# Altium PCB PCB1.PcbDoc
Units mm, origin at the board's own origin, x right, y up, seen from the top; angles counter-clockwise.
Board outline 44.07 x 33.15 mm, 2 copper layers (Top Layer, Bottom Layer); 10 components, 9 nets, 41 pads, 4 vias.
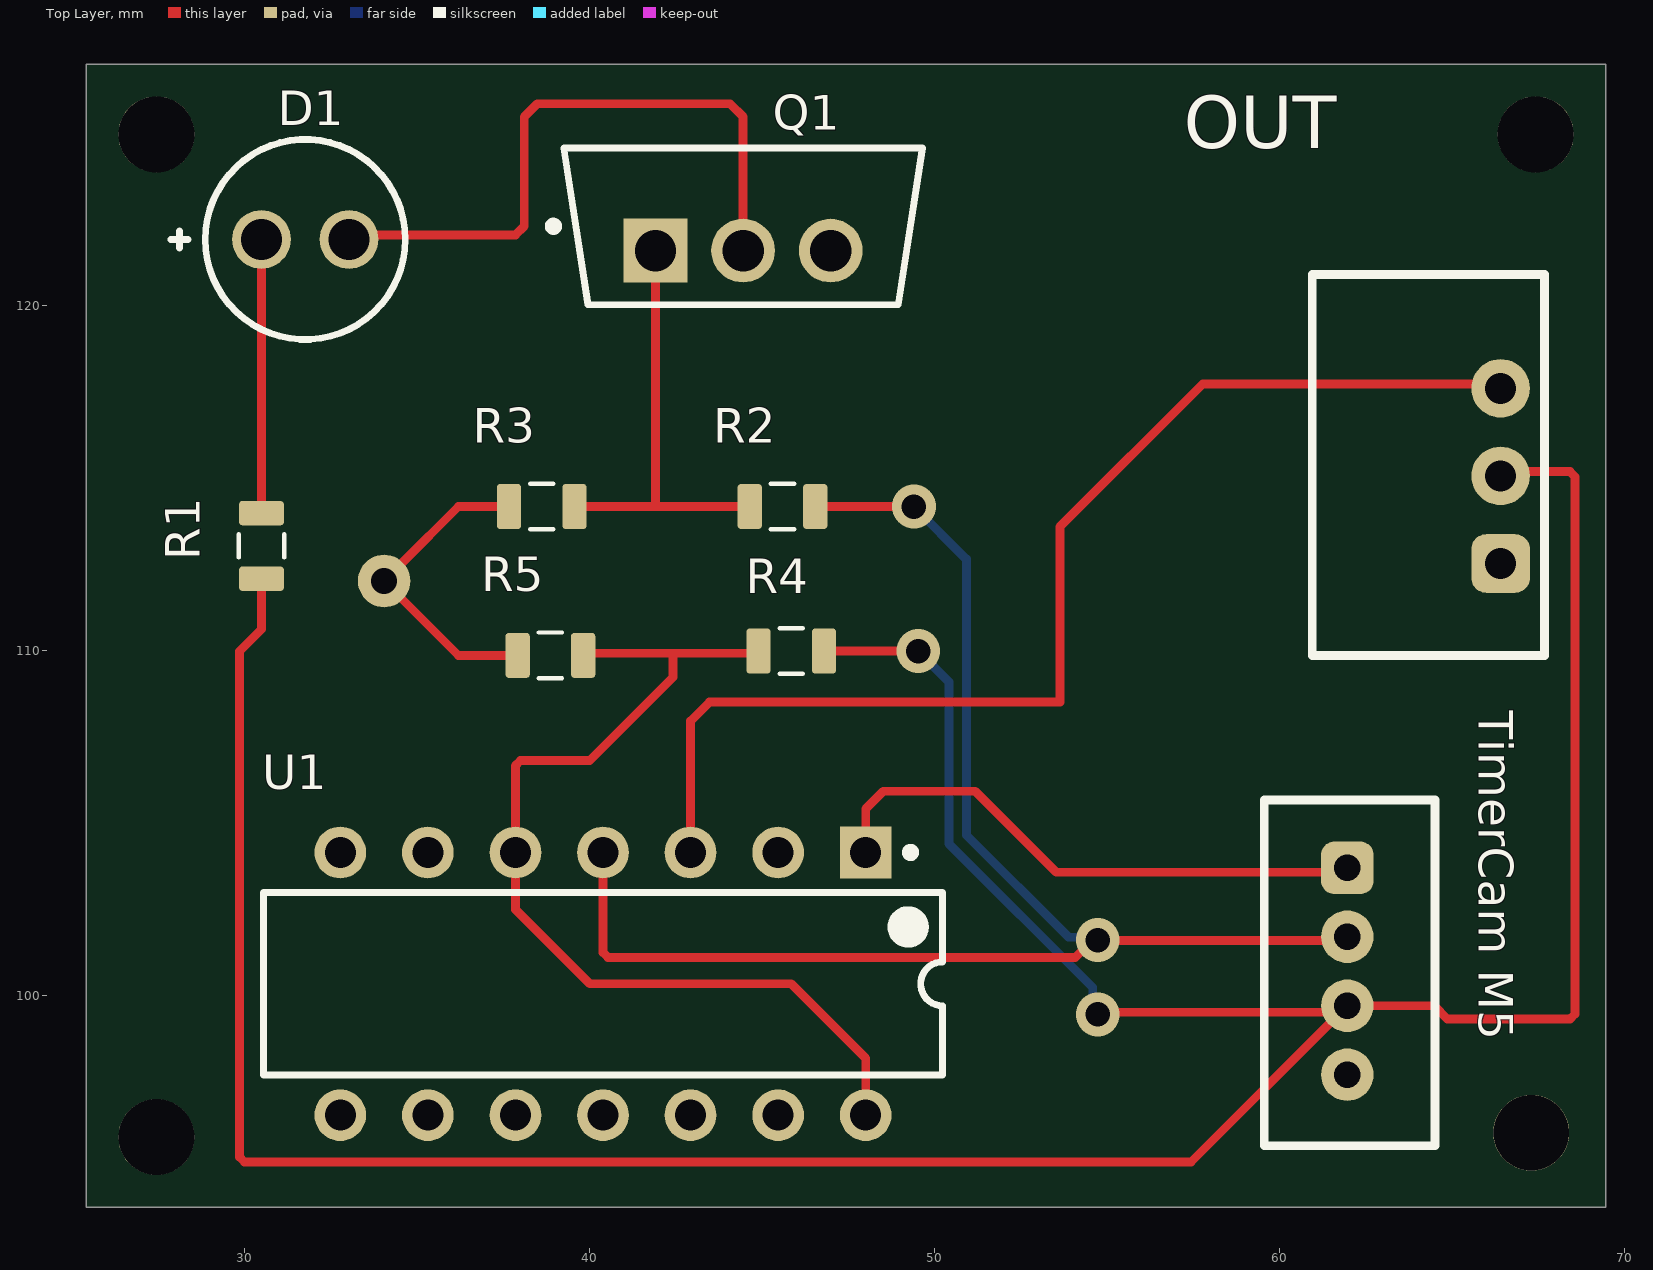
[diagram p0: Top Layer view]
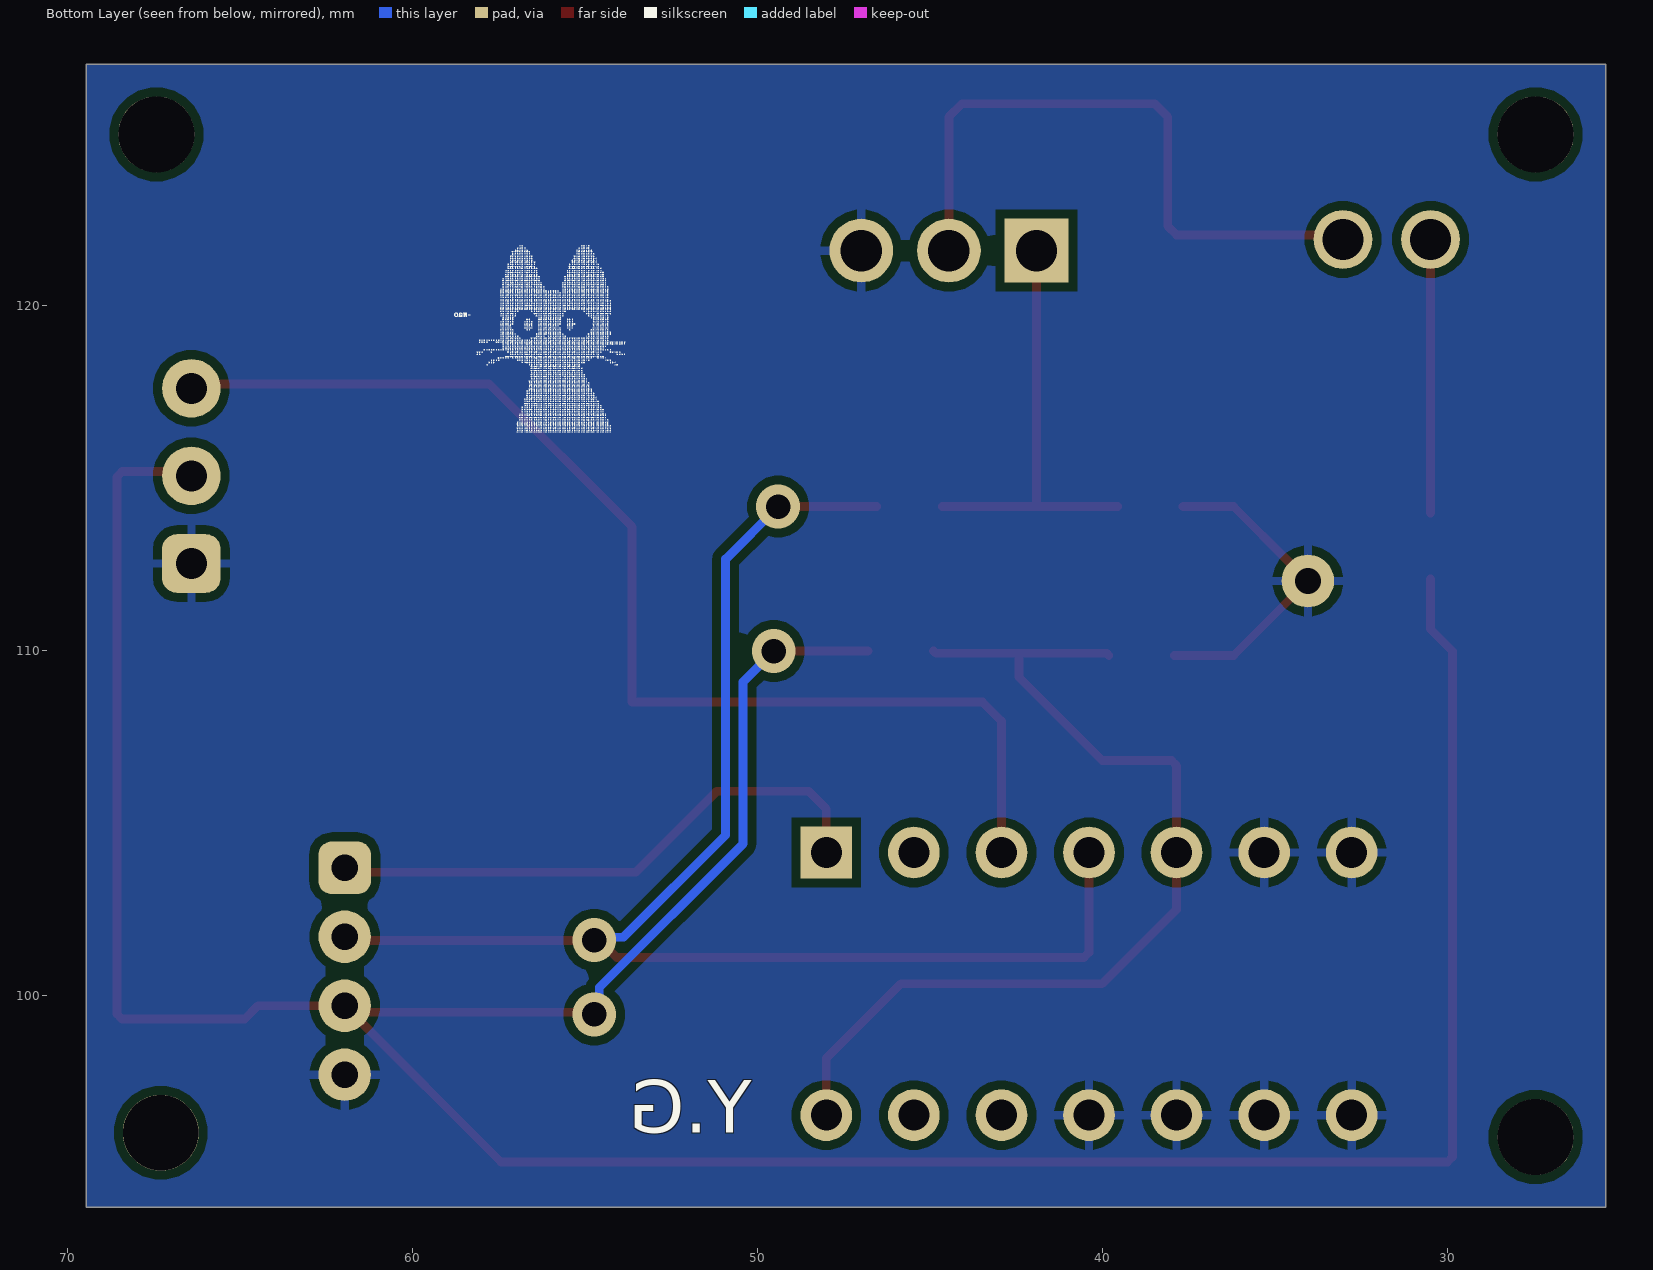
[diagram p1: Bottom Layer view, seen from below]

## Layer stack, top to bottom
Top Solder: solder mask 0.0102, Solder Resist, Dk 3.5
Top Layer: signal copper 0.0356
Dielectric 1: dielectric 0.32, FR-4, Dk 4.8
Bottom Layer: signal copper 0.0356
Bottom Solder: solder mask 0.0102, Solder Resist, Dk 3.5

## Board outline
25.4,93.853 69.469,93.853 69.469,127 25.4,127

## Design rules (kind name [scope] priority, off if disabled: settings)
Clearance [All] p1: gap=0.254 ignorepadtopadclearanceinfootprint=FALSE
PolygonConnect [All] p1: connectstyle=Relief reliefconductorwidth=0.254 reliefentries=4 polygonreliefangle="90 Angle" airgapwidth=0.254
RoutingVias [All] p1: holewidth=0.711 width=1.27 viastyle="Through Hole" minholewidth=0.711 minwidth=1.27 maxholewidth=0.711 maxwidth=1.27
SilkToSolderMaskClearance [IsPad] p1: minsilkscreentomaskgap=0.2 clearancetoexposedcopper=TRUE
SolderMaskExpansion [All] p1: expansion=0 istentingtop=FALSE
SupplyNets "Schematic Supply Nets" [InNet('GND')] p1: voltage=0.000
Width [All] p1: maxlimit=0.254 minlimit=0.254 preferedwidth=0.254
29 further rules are at their usual default settings.

## Components (designator, comment, footprint, x,y, rotation, side; value= is the part's Value field where it differs from the comment)
D1 "TSAL6200" "LED INF" 31.75,121.92 r0 top
OUT "SR-602" SR602 64.262,115.697 r90 top
Q1 "IRLZ44NPbF" IRF44Nfb 44.45,122.301 r90 top
R1 "220" RESISTOR_0805 30.48,113.03 r90 top
R2 "220" RESISTOR_0805 45.593,114.173 r180 top
R3 "100k" RESISTOR_0805 38.608,114.173 r180 top
R4 "1k" RESISTOR_0805 45.847,109.982 r180 top
R5 "2k" RESISTOR_0805 38.862,109.855 r180 top
"TimerCam M5" "TimerCam M5" TimerCam5 61.976,99.695 r270 top
U1 "CD4013BE" N0014A 40.386,100.33 r270 top

## Footprints (in the part's own frame and the unit in brackets; to place one, negate y for a bottom-side part, rotate by r counter-clockwise, add the part's x,y. Pads: shape width x height; smd on the part's side, far side on the other; paste and mask are expansions set on the pad)
IRF44Nfb [mm]
  rect 1.85x1.85 hole 1.2 paste-2539.97 mask+0: 1(-0.705,2.54)
  round 1.85 hole 1.2 paste-2539.97 mask+0: 2(-0.705,0) 3(-0.705,-2.54)
  silkscreen extent -2.27,-5.2 2.27,5.62, body extent -2.37,-5.55 2.37,5.55, height 0.25
"LED INF" [mm] "THD, 2-Leads, Dia 5.8mm, Pitch 2.54mm"
  round 1.7 hole 1.2: 1(-1.27,0) 2(1.27,0)
  silkscreen extent -3.9,-2.9 2.9,2.9
N0014A [mm] "DIP, 14-Leads, Body 19.7x6.6mm, Pitch 2.54mm"
  rect 1.5x1.5 hole 0.9: 1(-3.81,7.62)
  round 1.5 hole 0.9: 2(-3.81,5.08) 3(-3.81,2.54) 4(-3.81,0) 5(-3.81,-2.54) 6(-3.81,-5.08) 7(-3.81,-7.62) 8(3.81,-7.62) 9(3.81,-5.08) 10(3.81,-2.54) 11(3.81,0) 12(3.81,2.54) 13(3.81,5.08) 14(3.81,7.62)
  silkscreen extent -3.93,-9.85 2.65,9.85, body extent -3.95,-9.85 3.95,9.85, height 5.08
RESISTOR_0805 [mm]
  rrect25% 0.7x1.3 smd: 1(-0.95,0) 2(0.95,0)
  silkscreen extent -0.34,-0.66 0.34,0.66, body extent -1,-0.6 1,0.6, height 0.45
SR602 [mm]
  rrect50% 1.7x1.7 hole 0.9: 0(-3.175,-2.159)
  round 1.7 hole 0.9: 1(-0.635,-2.159) 2(1.905,-2.159)
  silkscreen extent -5.84,-3.43 5.21,3.3
TimerCam5 [mil]
  rrect50% 60x60 hole 30: 1(-157.48,0)
  round 60 hole 30: 2(-78.74,0) 3(0,0) 4(78.74,0)
  silkscreen extent -235,-95 160,100

## Part data
D1: library part "LED INF", "High Power Infrared Emitting Diode, GaAlAs, MQW, 1.35 V, 100 mA, -40 to 85 degC, 2-Pin THD, RoHS, Bulk", Forward Current=100mA, Forward Voltage=3V, Manufacturer=Vishay, Operating Temp Range=-40Cto85C, Operating Temperature Classification=Industrial, Package Description="2-Pin Through Hole Device, Dia 5.8 mm, Pitch 2.54 mm", Package Type=T-13/4, Power Dissipation=160W, Reverse Voltage=5V, Chip Material=GaAlAs, Datasheet URL=http://www.vishay.com/docs/81010/tsal6200.pdf, Datasheet Version="Rev. 2.4, 03/2014", DELETED=Compliant, High Brightness=Yes, Lens Dimensions=5x5x7.7mm, Lens Type=Colored, Lum Intensity=500mW/srmcd, Luminous Intensity=500mW/sr, Main Category=IrLED, Manufacturer URL=http://www.vishay.com/, Mounting=ThroughHole, Mounting Technology=ThroughHole, Number of  Elements=1, Package Reference=TSAL6200, Packaging=Bulk, Peak Wavelength=950nm, Pin Count=2, Product Depth (mm)=5.8mm, Product Height (mm)=8.7mm, Product Length (mm)=5.8mm, Rad Hardened=No, Shape Type=Circular, Test Current (It)=100mA, Type=IrLED, Viewing Angle=34deg
OUT: "PIR module"
Q1: "MOSFET N-CH 55V 47A TO220AB", Case/Package=TO-220, Continuous Drain Current (ID)=47A, Drain to Source Breakdown Voltage=55V, Drain to Source Resistance=35mR, Gate to Source Voltage (Vgs)=16V, Input Capacitance=1.7nF, Max Operating Temperature=175°C, Max Power Dissipation=110W, Min Operating Temperature=-55°C, Threshold Voltage=2V, Drain to Source Voltage (Vdss)=55V, Element Configuration=Single, Halogen Free="Halogen Free", Height=0.6inch, Lead Free="Lead Free", Length=0.414inch, Max Dual Supply Voltage=55V, Mount="Through Hole", Number of Pins=3, Packaging=Rail/Tube, Power Dissipation=110W, Rds On Max=22mR, REACH SVHC="No SVHC", RoHS Compliant=Yes, Turn-Off Delay Time=26ns, Turn-On Delay Time=11ns, Width=0.185inch
R1 R2 R3 R4 R5: library part Resistor, "Résistance"
U1: library part CMP-1619-00744-2, "CMOS Dual D-Type Flip Flop, N0014A, TUBE", F @ Nom Voltage(Max)(Mhz)=8, Generic Part Number=CD4013B, ICC @ Nom Voltage(Max)(mA)=0.06, Manufacturer="Texas Instruments", Operating Temperature Range(C)="-55 to 125", Rating=Military, tpd @ Nom Voltage(Max)(ns)=130, Voltage(Nom)(V)=10, 3-State Output=No, Bits(#)=2, Code_JEDEC=MS-001, DatasheetVersion=SCHS023D, Input Type=CMOS, Output Drive (IOL/IOH)(Max)(mA)=1.5/-1.5, Output Logic=Inverted,Non-inverted, Output Type=CMOS, PackageReference=N0014A, Schmitt Trigger=No, Technology Family=CD4000, VCC(Max)(V)=18, VCC(Min)(V)=3

## Free pads (board coordinates)
  round 2.2 hole 2.2 unplated: 4(27.432,95.885) 4(27.432,124.968) 4(67.31,96.012) 4(67.437,124.968)
  round 1.524 hole 0.762: 5(34.036,112.014)

## Via types
v1: diameter 1.27, hole 0.711, Top Layer to Bottom Layer, 4 vias

## Nets (pads, with @x,y where several pads share a name; then routed paths per layer and width w, separated by ;. In a path a pad name is that pad's centre, name@x,y a point inside that pad or via, vN(x,y) a via of type N, cw(c..) or ccw(c..) an arc to the next point about the centre after c; other vN are vias at no path point)
3.3V: R4.2 R5.1 U1.5 U1.14 | length 29.2
  Top Layer w0.254: R5.1 39.876,109.918 42.418,109.918 ; R4.2 44.834,109.918 42.418,109.918 ; U1.14 48.006,98.171 45.847,100.33 40.005,100.33 37.846,102.489 37.846,106.658 37.995,106.807 40.005,106.807 42.418,109.22 42.418,109.918
5V: "TimerCam M5.3" OUT.1 R1.1 R4.1 | length 98.3
  Top Layer w0.254: R1.1 30.48,110.617 29.842,109.979 29.842,95.31 29.99,95.162 57.443,95.162 61.785,99.504 ; R4.1 v1(49.53,109.982) ; v1(54.737,99.441) 54.8,99.504 61.785,99.504 ; OUT.1 66.548,115.189 68.431,115.189 68.58,115.04 68.58,99.456 68.431,99.307 64.88,99.307 64.492,99.695 61.976,99.695 61.785,99.504
  Bottom Layer w0.254: v1(49.53,109.982) 50.419,109.093 50.419,104.394 54.59,100.223 54.59,99.588 v1(54.737,99.441)
GATE: Q1.1 R2.2 R3.1 | length 12.5
  Top Layer w0.254: R3.1 41.91,114.173 ; Q1.1 41.91,114.173 ; R2.2 41.91,114.173
GND: "TimerCam M5.4" OUT.0 pad.5 Q1.3 R3.2 R5.2 U1.6 U1.7 U1.8 U1.9 U1.10 U1.11 | length 9.6
  Top Layer w0.254: R3.2 36.195,114.173 34.533,112.511 34.533,112.003 pad.5 36.195,109.855 R5.2
NetD1_1: D1.1 R1.2 | length 7.9
  Top Layer w0.254: R1.2 D1.1
"SCL / GPIO3": "TimerCam M5.1" U1.1 | length 16.5
  Top Layer w0.254: U1.1 48.006,105.41 48.514,105.918 51.181,105.918 53.531,103.568 61.849,103.568 61.976,103.695
"SDA / GPIO4": "TimerCam M5.2" R2.1 U1.4 | length 42.9
  Top Layer w0.254: U1.4 40.386,101.241 40.535,101.092 54.08,101.092 54.588,101.6 v1(54.737,101.6) 54.753,101.584 61.865,101.584 61.976,101.695 ; R2.1 v1(49.403,114.173)
  Bottom Layer w0.254: v1(49.403,114.173) 50.927,112.649 50.927,104.648 53.892,101.683 54.654,101.683 v1(54.737,101.6)
Signal: OUT.2 U1.3 | length 34.4
  Top Layer w0.254: U1.3 42.926,107.95 43.478,108.502 53.638,108.502 53.638,113.582 57.785,117.729 66.294,117.729 OUT.2
SOURCE: D1.2 Q1.2 | length 19
  Top Layer w0.254: D1.2 33.147,122.047 37.846,122.047 38.1,122.301 38.1,125.476 38.481,125.857 44.069,125.857 44.45,125.476 Q1.2
pads on no net: U1.2 U1.12 U1.13

## Polygon pours and split planes (outlines as drawn)
GND on Bottom Layer "GND_L02_P000" (solid, pour order 0): 25.4,127 69.469,127 69.469,93.853 25.4,93.853

## Silkscreen, mask and mechanical layers (free items; w line width, h text height)
Bottom Overlay:
  drawing of 3047 lines, arcs and shapes, not listed
  text "Y.G" at 50.165,96.012 h1.52
Mechanical 1:
  the board outline again, w1.2